# Altium PCB Pukk-Display-Module-v1.0.PcbDoc (part 4 of 5)
Units mil, origin at the board's own origin, x right, y up, seen from the top; angles counter-clockwise.
Board outline 3740.16 x 1574.8 mil, 4 copper layers (Top Layer, GND, POWER, Bottom Layer), stack 61.653 mil thick; 157 components, 115 nets, 640 pads, 314 vias.
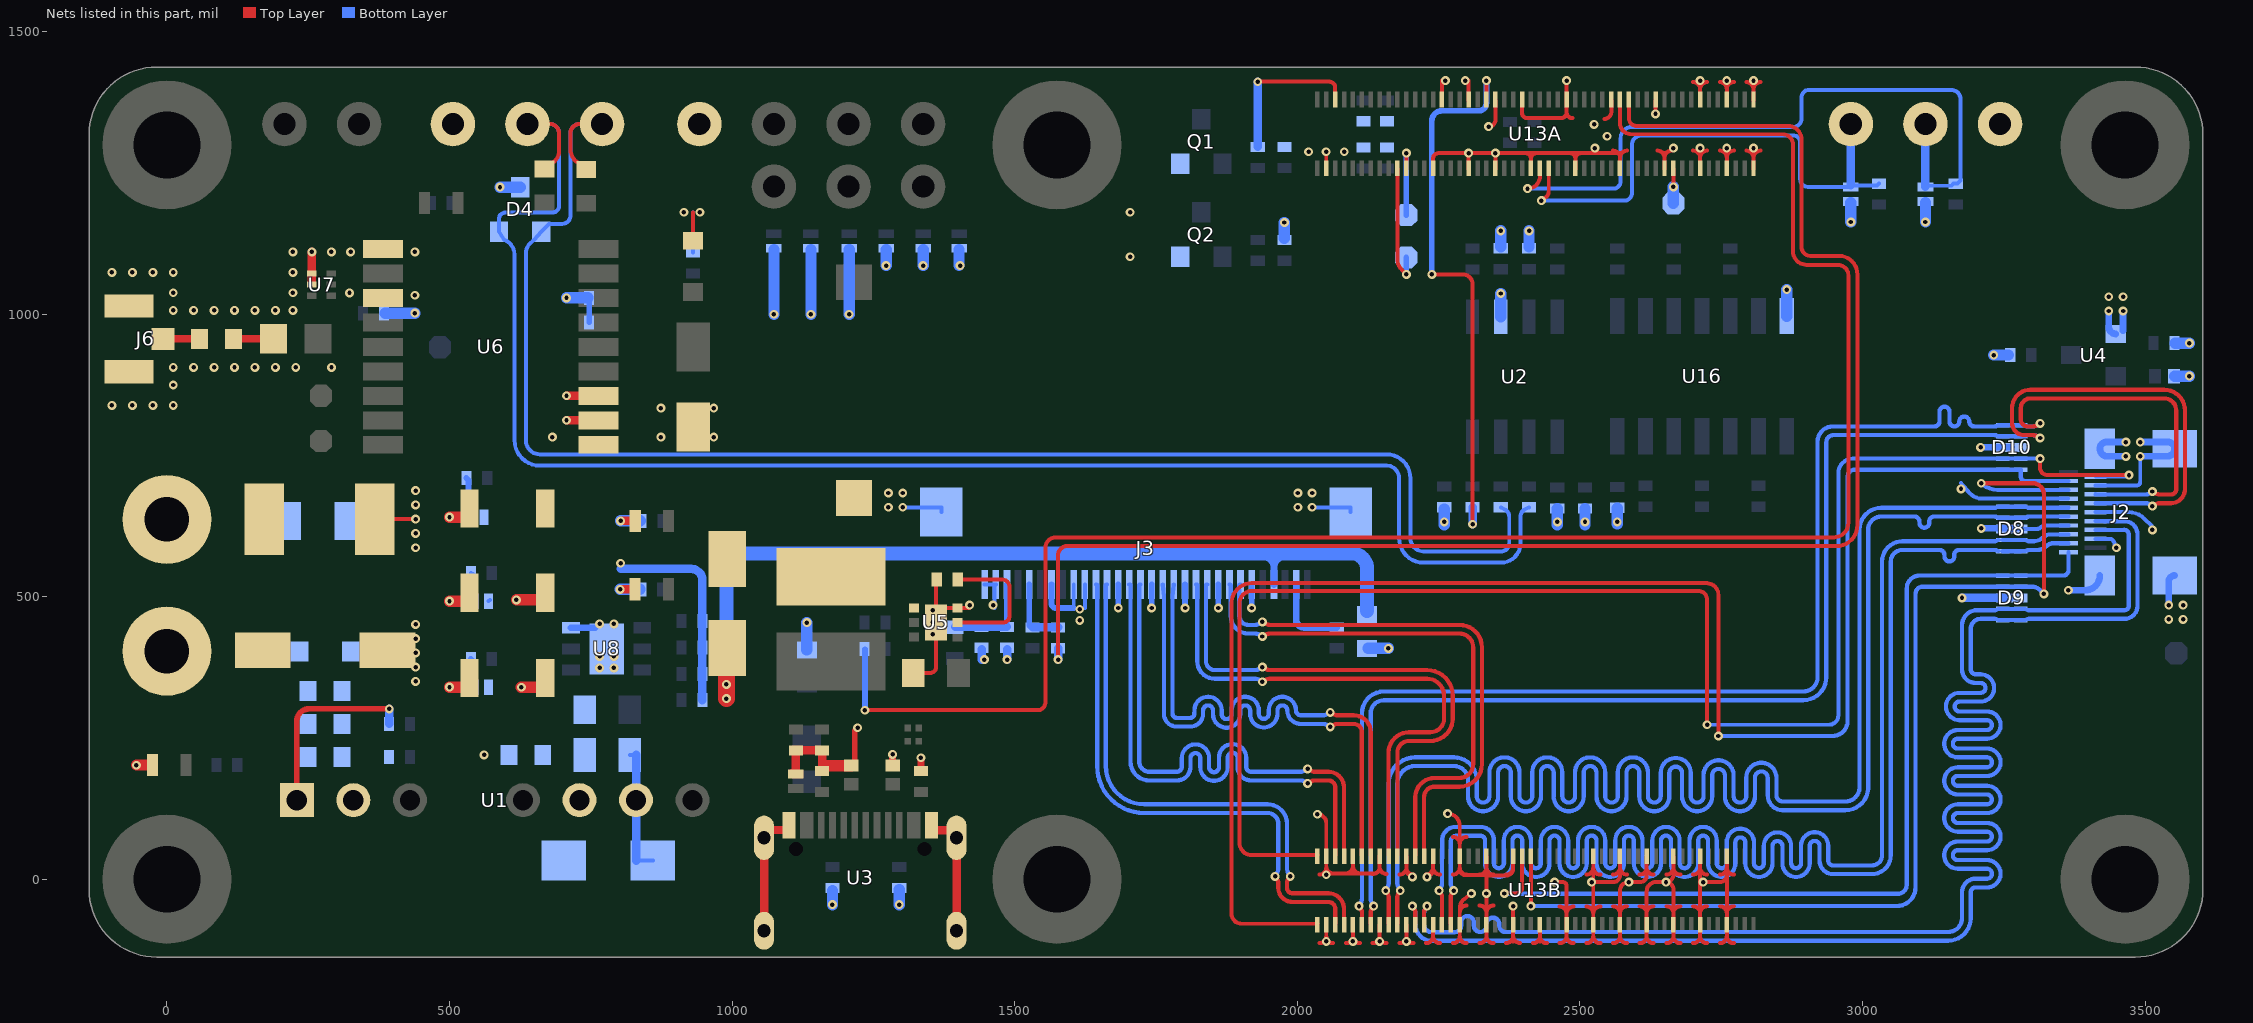
[diagram p4: the nets of this part, all layers, seen from the top]

## Via types
v1: diameter 15.75, hole 7.87, Top Layer to Bottom Layer, tented both sides, 314 vias

## Nets (pads, with @x,y where several pads share a name; then routed paths per layer and width w, separated by ;. In a path a pad name is that pad's centre, name@x,y a point inside that pad or via, vN(x,y) a via of type N, cw(c..) or ccw(c..) an arc to the next point about the centre after c; other vN are vias at no path point) (continued)
CAN1_N: D4.2 P4.1 R9.2 SB1.1 | length 2894.5
  Top Layer w7: P4.1@638,1336 678,1336 cw(c678,1320) 694,1320 694,1289.46 cw(c668,1289.46) 682,1267.55 SB1.1@668,1256.51
  Bottom Layer w7: P4.1@638,1336 678,1336 cw(c678,1320) 694,1320 694,1191.85 cw(c681.68,1191.85) 681.68,1179.54 598.81,1179.54 ccw(c598.81,1168.32) 587.6,1168.32 D4.2@587.6,1145.63 597.15,1131.02 cw(c587.6,1105.34) 615,1105.34 615,776.6 ccw(c659.81,776.6) 659.81,731.79 2157.86,731.79 cw(c2157.86,709.57) 2180.08,709.57 2180.08,603.43 ccw(c2223.51,603.43) 2223.51,560 2360,560 ccw(c2360,595) 2395,595 2395,641.53 cw(c2410,641.53) 2401,653.53 R9.2@2410,658
CAN1_P: D4.1 P3.1 R7.2 R11.2 | length 2773.2
  Top Layer w7: R11.2@742,1256 728,1267.4 cw(c742,1291.65) 714,1291.65 714,1320 cw(c730,1320) 730,1336 P3.1@770,1336
  Bottom Layer w7: P3.1@770,1336 730,1336 ccw(c730,1320) 714,1320 714,1174.37 cw(c699.14,1174.37) 699.14,1159.51 676.29,1159.51 D4.1@662.4,1145.63 649.76,1131.02 646.39,1128.59 ccw(c662.4,1106.36) 635,1106.36 635,776.6 ccw(c659.81,776.6) 659.81,751.79 2157.86,751.79 cw(c2157.86,709.57) 2200.08,709.57 2200.08,603.43 ccw(c2223.51,603.43) 2223.51,580 2360,580 ccw(c2360,595) 2375,595 2375,641.01 ccw(c2360,641.01) 2369,653.01 R7.2@2360,658
CAN_STB: R6.1 U13A.61 | length 997.8
  Top Layer w7: v1(2238,1070) 2293,1070 cw(c2293,1053) 2310,1053 v1(2310,628) ; U13A.61@2334.64,1377.95 v1(2334.64,1413.09)
  Bottom Layer w10: v1(2238,1070) 2238,1341.6 cw(c2255.9,1341.6) 2255.9,1359.5 2320.43,1359.5 ccw(c2320.43,1373.71) 2334.64,1373.71 v1(2334.64,1413.09)
  Bottom Layer w15: v1(2310,628) R6.1@2310,658
DIY_LED: R33.1 U13A.95 | length 281.2
  Top Layer w7: v1(1930,1411) 2056.98,1411 cw(c2056.98,1401.05) 2066.93,1401.05 2066.93,1388.23 U13A.95@2066.93,1377.95
  Bottom Layer w15: R33.1@1930,1295.52 v1(1930,1411)
EEPROM_nWP: P15.1 U13A.20 | length 60.7
  Top Layer w7: v1(2665.35,1225) U13A.20@2665.35,1256.69
  Bottom Layer w20: P15.1@2665.35,1196 v1(2665.35,1225)
ENC_CHA: D16.2 P22.1 R38.1 U13A.48 | length 953.2
  Top Layer w7: v1(2431.74,1200.48) 2439.74,1206.61 ccw(c2431.74,1217.04) 2444.88,1217.04 U13A.48@2444.88,1258.26
  Bottom Layer w7: v1(2431.74,1200.48) 2578.48,1200.48 ccw(c2578.48,1214) 2592,1214 2592,1299 cw(c2609,1299) 2609,1316 2877.02,1316 cw(c2877.02,1303.31) 2889.71,1303.31 2889.71,1238.42 ccw(c2903.13,1238.42) 2903.13,1225 2976.85,1225 ccw(c2976.85,1227.52) D16.2@2979.37,1227.52 ; D16.2@2980.63,1226.26 2981.89,1227.52 3025.99,1227.52 R38.1@3029,1230.53
  Bottom Layer w15: D16.2@2979.37,1227.52 P22.1@2979.37,1336
ENC_CHB: D24.2 P23.1 R39.1 U13A.50 | length 1294.6
  Top Layer w7: v1(2407.27,1221.72) ccw(c2407.27,1243.58) 2409.78,1221.86 ccw(c2407.27,1243.58) 2427.7,1235.8 ccw(c2407.27,1243.58) 2429.13,1243.58 U13A.50@2429.13,1258.26
  Bottom Layer w7: v1(2407.27,1221.72) 2558.72,1221.72 ccw(c2558.72,1235) 2572,1235 2572,1311 cw(c2592,1311) 2592,1331 2877.45,1331 ccw(c2877.45,1345.55) 2892,1345.55 2892,1382.96 cw(c2905.58,1382.96) 2905.58,1396.54 3156.87,1396.54 cw(c3156.87,1379.98) 3173.43,1379.98 3173.43,1236.03 3168.13,1230.73 R39.1@3161,1230.73 ; D24.2@3111.37,1225 3113.27,1226.9 3157.37,1226.9 R39.1@3161,1230.53
  Bottom Layer w15: D24.2@3111.37,1225 P23.1@3111.37,1336
GND: C5.1 C6.1 C7.1 C8.1 C9.1 C10.1 C11.1 C12.1 C13.1 C14.1 C15.1 C16.1 C17.1 C18.1 C19.1 C20.1 C21.1 C22.1 C23.1 C24.1 C25.2 C27.1 C28.2 C29.1 C30.1 C32.1 C33.1 C34.1 C35.1 C80.2 D3.1 D4.3 D5.2 D6.2 D7.2 D8.3_8 D9.3_8 D10.3_8 D11.2 D14.1 D15.2 D16.1 D17.2 D18.2 D19.1 D20.1 D21.1 D22.1 D23.1 D24.1 J2.4 J2.7 J2.10 J2.13 J2.16 J2.20 J3.1 J3.2 J3.7 J3.9 J3.10 J3.13 J3.16 J3.19 J3.22 J3.25 J3.S1 J3.S2 J4.2 J6.2 J6.3 LED1.2 P5.1 P14.1 P24.1 Q1.2 Q2.2 R5.1 R13.1 R14.1 R18.1 R35.1 R36.1 SW1.2 SW2.2 SW3.2 U1.7 U2.2 U3.A1/B12 U3.B1/A12 U3.S1 U3.S2 U3.S3 U3.S4 U4.1 U5.3 U5.7 U6.1 U6.10 U6.12 U7.1 U7.2 U8.6 U8.7 U13A.1 U13A.2 U13A.7 U13A.8 U13A.13 U13A.14 U13A.22 U13A.23 U13A.32 U13A.33 U13A.42 U13A.43 U13A.52 U13A.53 U13A.59 U13A.60 U13A.65 U13A.66 U13A.71 U13A.74 U13A.98 U13B.7 U13B.8 U13B.13 U13B.14 U13B.19 U13B.20 U13B.25 U13B.26 U13B.31 U13B.32 U13B.37 U13B.38 U13B.44 U13B.50 U13B.55 U13B.56 U13B.61 U13B.62 U13B.67 U13B.68 U13B.73 U13B.74 U13B.79 U13B.80 U13B.85 U13B.86 U13B.91 U13B.92 U13B.97 U13B.98 U16.7 | length 10085.1
  Top Layer w7: J6.2@-67.02,897.93 J6.2@-61.05,897.93 ; J6.3@-67.02,1014.07 J6.3@-61.05,1014.07 ; SW2.2@656.8,494.32 SW2.2@669.44,507 ; SW1.2@656.8,640.09 669.44,652.73 SW1.2@669.44,656 ; SW3.2@669.44,339.6 SW3.2@669.44,356 ; C17.1@1159.22,191.61 1159.57,197.11 1163.43,200.96 ; D7.2@1211.02,201.4 D7.2@1217,207.38 ; J4.2@1215.72,674.41 J4.2@1215.72,683.31 ; R18.1@1320.58,365 1350.43,365 ccw(c1350.43,375.65) 1361.08,375.65 U5.7@1361.08,433.51 ; U5.7@1360.58,454.23 1360.58,479.82 U5.7@1361.08,479.82 ; C23.1@1362.08,530 1361.08,530 U5.7@1361.08,479.82 ; v1@1420.18,479.82 U5.3@1398.97,479.82 U5.7@1361.08,479.82 ; v1(2035.43,115) cw(c2035.43,99.25) 2051.18,99.25 2051.18,42.51 2051.18,22.58 ; 2038.78,-113.07 ccw(c2038.78,-100.68) 2051.18,-100.68 ; 2038.78,8.19 ccw(c2038.78,20.58) 2051.18,20.58 ; v1(2051.18,-110) 2051.18,-98.68 ; U13B.98@2051.18,-80.75 2051.18,-100.68 ; U13A.98@2051.18,1258.26 v1@2051.18,1286.68 ; 2063.57,-113.07 cw(c2063.57,-100.68) 2051.18,-100.68 ; 2063.57,10.19 cw(c2063.57,22.58) 2051.18,22.58 ; 2086.03,-113.07 ccw(c2086.03,-100.68) 2098.42,-100.68 ; 2086.03,10.19 ccw(c2086.03,22.58) 2098.42,22.58 ; v1(2098.42,-110) 2098.42,-98.68 ; U13B.92@2098.42,-80.75 2098.42,-100.68 ; U13B.91@2098.42,42.51 2098.42,22.58 ; 2110.82,-113.07 cw(c2110.82,-100.68) 2098.42,-100.68 ; 2110.82,10.19 cw(c2110.82,22.58) 2098.42,22.58 ; 2133.27,-113.07 ccw(c2133.27,-100.68) 2145.67,-100.68 ; 2133.27,9.19 ccw(c2133.27,21.58) 2145.67,21.58 ; v1@2145.67,-112 2145.67,-100.68 ; U13B.86@2145.67,-80.75 2145.67,-100.68 ; 2145.67,22.58 2145.67,20.75 cw(c2134.92,20.75) 2134.92,10 2091.41,10 ; U13B.85@2145.67,41.51 2145.67,21.58 ; 2158.06,-113.07 cw(c2158.06,-100.68) 2145.67,-100.68 ; 2158.06,9.19 cw(c2158.06,21.58) 2145.67,21.58 ; 2180.51,-113.07 ccw(c2180.51,-100.68) 2192.91,-100.68 ; 2180.51,8.19 ccw(c2180.51,20.58) 2192.91,20.58 ; v1(2192.91,-110) 2192.91,-98.68 ; U13B.80@2192.91,-80.75 2192.91,-100.68 ; 2192.91,16.01 2192.91,21.58 ; 2192.91,17.01 ccw(c2203.66,17.01) v1@2203.66,6.26 ; U13B.79@2192.91,40.51 2192.91,20.58 ; 2205.31,-113.07 cw(c2205.31,-100.68) 2192.91,-100.68 ; v1@2205.31,8.19 cw(c2205.31,20.58) 2192.91,20.58 ; 2227.76,-113.07 ccw(c2227.76,-100.68) 2240.15,-100.68 ; v1@2227.76,8.19 ccw(c2227.76,20.58) 2240.15,20.58 ; v1@2229.41,6.26 ccw(c2229.41,17.01) 2240.15,17.01 ; U13B.74@2240.15,-80.75 2240.15,-100.68 ; 2240.15,16.01 2240.15,21.58 ; U13B.73@2240.15,40.51 2240.15,20.58 ; U13A.74@2240.15,1256.69 2240.15,1274.76 cw(c2249.98,1274.76) 2249.98,1284.59 v1(2350.39,1284.59) ; 2252.55,-113.07 cw(c2252.55,-100.68) 2240.15,-100.68 ; 2252.55,8.19 cw(c2252.55,20.58) 2240.15,20.58 ; U13A.71@2255.9,1377.95 v1@2255.9,1413.09 ; v1(2266,116) cw(c2266,94.6) 2287.4,94.6 2287.4,62.44 ; 2275,-113.07 ccw(c2275,-100.68) 2287.4,-100.68 ; 2275,8.19 ccw(c2275,20.58) 2287.4,20.58 ; 2275,74.84 cw(c2275,62.44) 2287.4,62.44 ; U13B.68@2287.4,-80.75 2287.4,-100.68 ; U13B.68@2287.4,-78.75 2287.4,-58.82 ; 2287.4,17.07 2287.4,21.58 ; 2287.4,18.07 ccw(c2298.35,18.07) 2298.35,7.12 2333.15,7.12 2334.64,8.61 ; U13B.67@2287.4,40.51 2287.4,20.58 ; U13B.67@2287.4,42.51 2287.4,62.44 ; 2299.79,-113.07 cw(c2299.79,-100.68) 2287.4,-100.68 ; 2299.79,-46.42 ccw(c2299.79,-58.82) 2287.4,-58.82 ; 2299.79,8.19 cw(c2299.79,20.58) 2287.4,20.58 ; 2299.79,74.84 ccw(c2299.79,62.44) 2287.4,62.44 ; U13A.66@2303.15,1256.69 v1(2303.15,1284.59) ; U13A.65@2303.15,1377.95 v1@2303.15,1413.09 ; v1(2307.83,-25.3) 2295.39,-34.84 ccw(c2307.83,-51.05) 2287.4,-51.05 2287.4,-58.82 ; 2322.25,-113.07 ccw(c2322.25,-100.68) 2334.64,-100.68 ; 2322.25,-46.42 cw(c2322.25,-58.81) 2334.64,-58.81 ; 2322.25,8.19 ccw(c2322.25,20.58) 2334.64,20.58 ; U13B.62@2334.64,-80.75 2334.64,-100.68 ; U13B.62@2334.64,-78.75 2334.64,-58.81 ; 2334.64,7.61 2334.64,21.58 ; U13B.61@2334.64,40.51 2334.64,20.58 ; v1(2338.58,1331.51) ccw(c2338.58,1343.32) 2350.39,1343.32 U13A.59@2350.39,1377.95 ; 2347.04,-113.07 cw(c2347.04,-100.68) 2334.64,-100.68 ; 2347.04,-46.42 ccw(c2347.04,-58.81) 2334.64,-58.81 ; 2347.04,8.19 cw(c2347.04,20.58) 2334.64,20.58 ; U13A.60@2350.39,1256.69 v1(2350.39,1284.59) ; 2369.49,-113.07 ccw(c2369.49,-100.68) 2381.89,-100.75 ; 2369.49,8.19 ccw(c2369.49,20.58) 2381.89,20.58 U13B.55@2381.89,40.51 ; 2381.89,-110 2381.89,-98.75 ccw(c2369.49,-98.68) 2381.89,-98.68 2381.89,-78.75 v1(2381.89,-47.49) ; 2381.89,-100.68 ccw(c2394.28,-100.68) 2381.89,-100.75 ; U13B.56@2381.89,-80.75 2381.89,-100.75 ; 2381.89,17.62 2381.89,21.58 ; 2381.89,18.62 cw(c2370.08,18.62) 2370.08,6.81 2336.44,6.81 cw(c2336.44,8.61) 2334.64,8.61 ; 2394.28,-113.07 cw(c2394.28,-100.68) 2381.89,-100.75 ; U13A.53@2397.63,1377.95 2397.63,1355.71 ccw(c2406.92,1355.71) 2406.92,1346.42 2465.95,1346.42 ccw(c2465.95,1356.85) 2476.37,1356.85 ; U13A.52@2413.38,1256.69 2413.38,1274.76 ; 2416.74,-113.07 ccw(c2416.74,-100.68) 2429.13,-100.68 ; 2429.13,-110 2429.13,-98.68 ; U13B.50@2429.13,-80.75 2429.13,-100.68 ; 2441.53,-113.07 cw(c2441.53,-100.68) 2429.13,-100.68 ; v1(2455.2,-5) 2469.23,-5 cw(c2469.23,-12.14) 2476.37,-12.14 U13B.44@2476.37,-78.75 ; 2463.98,-113.07 ccw(c2463.98,-100.68) 2476.37,-100.68 ; 2463.98,-48.42 cw(c2463.98,-60.81) 2476.37,-60.81 cw(c2488.77,-60.81) 2488.77,-48.42 ; U13B.44@2476.37,-80.75 2476.37,-100.68 ; v1(2476.37,1413.09) 2476.37,1377.95 2476.37,1356.85 ; 2486.8,1346.42 cw(c2486.8,1356.85) 2476.37,1356.85 ; 2488.77,-113.07 cw(c2488.77,-100.68) 2476.37,-100.68 ; U13A.42@2492.12,1256.69 2492.12,1274.76 ; 2492.12,1277.09 2492.12,1274.76 ; 2511.22,-113.07 ccw(c2511.22,-100.68) 2523.62,-100.68 ; 2511.22,-48.42 cw(c2511.22,-60.81) 2523.62,-60.81 cw(c2536.01,-60.81) 2536.01,-48.42 ; 2511.22,8.19 ccw(c2511.22,20.58) 2523.62,20.58 ; U13B.38@2523.62,-80.75 2523.62,-100.68 ; U13B.38@2523.62,-78.75 2523.62,-7.85 ccw(c2520.77,-7.85) v1(2520.77,-5) ; v1@2523.62,-0.12 2523.62,20.58 ; v1@2523.62,1.88 cw(c2513.9,1.88) v1(2520.77,-5) ; U13B.37@2523.62,40.51 2523.62,20.58 ; 2536.01,-113.07 cw(c2536.01,-100.68) 2523.62,-100.68 ; 2536.01,8.19 cw(c2536.01,20.58) 2523.62,20.58 ; 2543.16,1345.18 ccw(c2543.16,1357.58) 2555.55,1357.58 2555.55,1377.51 U13A.33@2555.11,1377.95 ; 2558.47,-113.07 ccw(c2558.47,-100.68) 2570.86,-100.68 ; 2558.47,-47.85 cw(c2558.47,-60.24) 2570.86,-60.24 cw(c2583.26,-60.24) 2583.26,-47.85 ; 2558.47,8.19 ccw(c2558.47,20.58) 2570.86,20.58 ; 2558.47,1289.02 cw(c2558.47,1276.62) 2567.96,1284.59 ; U13B.32@2570.86,-80.75 2570.86,-100.68 ; U13B.32@2570.86,-78.75 2570.86,-20.66 cw(c2586.52,-20.66) v1(2586.52,-5) 2606.3,-5.02 ccw(c2606.3,6.79) 2618.11,6.79 ; 2570.86,4.81 2570.86,20.58 ; 2570.86,6.81 cw(c2559.05,6.81) 2559.05,-5 v1(2520.77,-5) ; U13B.31@2570.86,40.51 2570.86,20.58 ; U13A.32@2570.86,1256.69 2570.86,1276.62 ; 2583.26,-113.07 cw(c2583.26,-100.68) 2570.86,-100.68 ; 2583.26,8.19 cw(c2583.26,20.58) 2570.86,20.58 ; 2583.26,1289.02 ccw(c2583.26,1276.62) 2570.86,1276.62 ; 2605.71,-113.07 ccw(c2605.71,-100.68) 2618.11,-100.68 ; 2605.71,-47.85 cw(c2605.71,-60.24) 2618.1,-60.24 cw(c2630.5,-60.24) 2630.5,-47.85 ; 2605.71,8.19 ccw(c2605.71,20.58) 2618.11,20.58 ; U13B.26@2618.11,-80.75 2618.11,-100.68 ; U13B.26@2618.11,-78.75 2618.11,-21.44 cw(c2634.55,-21.44) 2634.55,-5 v1(2652.27,-5) ; 2618.11,4.79 2618.11,20.58 ; U13B.25@2618.11,40.51 2618.11,20.58 ; 2630.5,-113.07 cw(c2630.5,-100.68) 2618.11,-100.68 ; 2630.5,8.19 cw(c2630.5,20.58) 2618.11,20.58 ; v1@2633.85,1354.11 U13A.23@2633.85,1377.95 ; 2637.21,1289.02 cw(c2637.21,1276.62) 2649.6,1276.62 ; U13A.22@2649.6,1256.69 2649.6,1276.62 ; 2649.6,1285 2649.6,1276.62 ; 2652.96,-113.07 ccw(c2652.96,-100.68) 2665.35,-100.68 ; 2652.95,-47.85 cw(c2652.95,-60.24) 2665.35,-60.24 cw(c2677.74,-60.24) 2677.74,-47.85 ; 2652.96,8.19 ccw(c2652.96,20.58) 2665.35,20.58 ; v1@2662,1289.02 ccw(c2662,1276.62) 2649.6,1276.62 ; U13B.20@2665.35,-80.75 2665.35,-100.68 ; U13B.20@2665.35,-78.75 2665.35,-18.08 ccw(c2652.27,-18.08) v1(2652.27,-5) ; 2665.35,6.08 2665.35,20.58 ; 2665.35,8.08 cw(c2652.27,8.08) v1(2652.27,-5) ; U13B.19@2665.35,40.51 2665.35,20.58 ; 2677.75,-113.07 cw(c2677.75,-100.68) 2665.35,-100.68 ; 2677.75,8.19 cw(c2677.75,20.58) 2665.35,20.58 ; 2700.2,-113.07 ccw(c2700.2,-100.68) 2712.6,-100.68 ; 2700.2,-47.85 cw(c2700.2,-60.24) 2712.59,-60.24 cw(c2724.99,-60.24) 2724.99,-47.85 ; 2700.2,8.19 ccw(c2700.2,20.58) 2712.6,20.58 ; 2700.2,1289.02 cw(c2700.2,1276.62) 2712.6,1276.62 ; 2700.2,1410.28 cw(c2700.2,1397.88) 2712.6,1397.88 ; U13B.14@2712.6,-80.75 2712.6,-100.68 ; U13B.14@2712.6,-78.75 2712.6,0.99 ccw(c2718.61,0.99) 2718.61,-5.02 2748.03,-5.02 ccw(c2748.03,6.79) 2759.84,6.74 U13B.8@2759.84,-78.75 ; v1@2712.6,-1.01 2712.6,20.58 ; U13B.13@2712.6,40.51 2712.6,20.58 ; U13A.14@2712.6,1256.69 2712.6,1276.62 ; 2712.6,1285 2712.6,1276.62 ; U13A.13@2712.6,1377.95 2712.6,1397.88 ; v1(2712.6,1413.09) 2712.6,1397.88 ; 2724.99,-113.07 cw(c2724.99,-100.68) 2712.6,-100.68 ; 2724.99,8.19 cw(c2724.99,20.58) 2712.6,20.58 ; 2724.99,1289.02 ccw(c2724.99,1276.62) 2712.6,1276.62 ; 2724.99,1410.28 ccw(c2724.99,1397.88) 2712.6,1397.88 ; 2747.44,-113.07 ccw(c2747.44,-100.68) 2759.84,-100.68 ; 2747.44,-47.85 cw(c2747.44,-60.24) 2759.84,-60.24 cw(c2772.23,-60.24) 2772.23,-47.85 ; 2747.44,8.19 ccw(c2747.44,20.58) 2759.84,20.58 ; 2747.44,1289.02 cw(c2747.44,1276.62) 2759.84,1276.62 ; 2747.44,1410.28 cw(c2747.44,1397.88) 2759.84,1397.88 ; U13B.8@2759.84,-80.75 2759.84,-100.68 ; 2759.84,4.79 2759.84,20.58 ; U13B.7@2759.84,40.51 2759.84,20.58 ; U13A.8@2759.84,1256.69 2759.84,1276.62 ; 2759.84,1285 2759.84,1276.62 ; U13A.7@2759.84,1377.95 2759.84,1397.88 ; v1(2759.84,1413.09) 2759.84,1397.88 ; 2772.23,-113.07 cw(c2772.23,-100.68) 2759.84,-100.68 ; 2772.23,8.19 cw(c2772.23,20.58) 2759.84,20.58 ; 2772.23,1289.02 ccw(c2772.23,1276.62) 2759.84,1276.62 ; 2772.23,1410.28 ccw(c2772.23,1397.88) 2759.84,1397.88 ; 2794.69,1289.02 cw(c2794.69,1276.62) 2807.08,1276.62 ; 2794.69,1410.28 cw(c2794.69,1397.88) 2807.08,1397.88 ; U13A.2@2807.08,1256.69 2807.08,1276.62 ; 2807.08,1285 2807.08,1276.62 ; U13A.1@2807.08,1377.95 2807.08,1397.88 ; v1(2807.08,1413.09) 2807.08,1397.88 ; 2819.48,1289.02 ccw(c2819.48,1276.62) 2807.08,1276.62 ; 2819.48,1410.28 ccw(c2819.48,1397.88) 2807.08,1397.88 ; 2051.18,22.58 2051.18,10 2091.41,10 ; 2091.41,10 ccw(c2091.41,17.01) 2098.42,17.01 2098.42,22.58 ; 2334.64,-58.81 v1(2334.64,-25.3) 2334.64,8.61 ; v1(2350.39,1284.59) 2403.56,1284.59 ; 2403.56,1284.59 cw(c2403.56,1274.76) 2413.38,1274.76 ; 2403.56,1284.59 2423.21,1284.59 ; 2413.38,1274.76 cw(c2423.21,1274.76) 2423.21,1284.59 ; 2423.21,1284.59 2482.3,1284.59 ; 2482.3,1284.59 cw(c2482.3,1274.76) 2492.12,1274.76 ; 2482.3,1284.59 2501.95,1284.59 ; 2492.12,1274.76 cw(c2501.95,1274.76) 2501.95,1284.59 ; 2501.95,1284.59 2567.96,1284.59 ; 2567.96,1284.59 cw(c2558.47,1276.62) 2570.86,1276.62 ; 2567.96,1284.59 2570.86,1284.59 2570.86,1276.62
  Top Layer w10: D7.2@1217,207.38 v1@1217,263
  Top Layer w12: D5.2@1105.18,188.59 1105.18,187.78 1107.05,185.9 D5.2@1112.96,185.9 ; D6.2@1283.96,201.4 v1(1283.96,220.88) ; v1@1334,210 1334.13,209.87 1334.13,191.74 C18.1@1334.26,191.61
  Top Layer w15: U7.2@256.54,1055.11 U7.1@256.54,1071.69 v1(256.54,1109.85) ; U3.S3@1056.5,-91.28 U3.S4@1056.5,73.29 ; U3.S4@1056.5,73.97 1069.63,87.1 1092.48,87.1 1100.79,95.41 U3.A1/B12@1100.79,95.73 U3.A1/B12@1100.79,96.05 ; D5.2@1112.96,185.9 C15.1@1112.96,227.83 C16.1@1159.22,227.83 C17.1@1159.22,191.61 ; U3.B1/A12@1352.76,95.73 1352.76,95.09 1361.07,86.78 1383.91,86.78 1397.05,73.65 U3.S1@1397.05,73.29 U3.S2@1397.05,-91.28
  Top Layer w20: v1@-53.71,202 LED1.2@-27.76,202 ; v1(618.4,494.32) SW2.2@656.8,494.32 ; v1(627.05,339.6) SW3.2@669.44,339.6 ; 1163.43,200.96 D7.2@1210.58,200.96
  Bottom Layer w7: D17.2@569.17,492 D17.2@571.49,494.32 ; C5.1@819,220 C5.1@830,220 ; D3.1@830,33 D3.1@859.74,33 ; v1(1301.9,658.06) 1370.08,658.06 J3.S2@1370.08,649.6 ; J3.1@1446.85,521.65 J3.2@1463.84,521.65 ; v1@1463.84,479.82 J3.2@1463.84,521.65 ; J3.2@1466.84,521.65 J3.2@1466.53,521.65 J3.2@1463.84,521.65 ; 1604.48,479.82 J3.9@1604.48,521.65 ; 1624.17,479.82 J3.10@1624.17,521.65 ; v1(2026.31,658.06) 2094.49,658.06 J3.S1@2094.49,649.6 ; 3174.2,700.64 3179.17,695.04 3190.16,682.65 ccw(c3210.43,700.64) 3210.43,673.53 3232.4,673.53 3232.51,673.64 3348.28,673.64 3348.4,673.52 J2.13@3363.91,673.52 ; D8.3_8@3264,619.83 3309.56,619.83 ccw(c3309.56,626.89) 3314.56,621.9 cw(c3324.05,612.4) 3324.05,625.83 J2.7@3364.36,625.83 ; J2.4@3412.39,602.21 3436.54,602.21 cw(c3436.54,593.14) 3445.47,594.76 v1@3447.03,586.49 ; J2.10@3412.39,649.46 3470.37,649.46 cw(c3470.45,609.05) 3499.02,637.62 3511.11,625.54 3511.11,619.63 v1(3512.78,617.96) ; J2.16@3412.39,696.7 3485.01,696.7 ccw(c3485.01,703.05) 3491.35,703.05 v1(3491.35,748.21)
  Bottom Layer w10: C29.1@747,985.14 C30.1@747,1028.54 ; J3.7@1564.96,521.65 1564.96,487.53 ccw(c1572.67,487.53) 1572.67,479.82 1604.48,479.82 ; v1(1683.22,479.82) J3.13@1683.22,521.65 ; v1(1742.28,479.82) J3.16@1742.28,521.65 ; v1(1801.33,479.82) J3.19@1801.33,521.65 ; v1(1860.39,479.82) J3.22@1860.39,521.65 ; v1(1919.29,479.82) J3.25@1919.29,521.65
  Bottom Layer w12: U8.6@715.19,444.89 U8.7@757.21,444.89 ; v1(3208.83,764.16) D10.3_8@3263.78,764.16 ; v1(3210.04,620.83) 3263,620.83 D8.3_8@3264,619.83 ; v1(3364.36,511.22) 3393.84,511.22 ccw(c3393.84,537.25) J2.20@3419.87,537.25 ; v1(3435.66,1005.34) 3435.66,977.34 ccw(c3448.2,977.34) U4.1@3448.2,964.8 ; U4.1@3460.91,970.2 v1(3460.91,1005.34) ; v1(3466.1,748.21) 3433.32,748.21 cw(c3433.32,761.66) J2.20@3419.87,761.66 cw(c3431.67,761.66) 3431.67,773.46 v1(3466.1,773.46) ; v1(3491.35,748.21) 3538.7,748.21 ccw(c3538.7,761.66) J2.20@3552.15,761.66 ccw(c3540.35,761.66) 3540.35,773.46 v1(3491.35,773.46) ; v1(3541.81,484.93) 3541.81,526.91 cw(c3552.15,526.91) J2.20@3552.15,537.25
  Bottom Layer w15: 802.68,549 927.8,549 cw(c927.8,529.3) 947.5,529.3 C34.1@947.5,456.59 C33.1@947.5,363.05 C32.1@947.5,317 ; D3.1@830,33 U1.7@830,140 C5.1@830,220 ; v1@1441.32,388.66 C24.1@1441.32,406.8 ; v1(1486.59,388.66) C25.2@1486.59,406.8 ; v1(3176.01,497.88) D9.3_8@3260.06,497.88
  Bottom Layer w20: C27.1@386.12,1001.46 v1(438.89,1001.46) ; v1(589.37,1224.37) D4.3@625,1224.37 ; v1(707,1028.54) C30.1@745,1028.54 ; v1(1074,999.5) D23.1@1074,1114.28 ; C21.1@1132.28,405.55 v1(1132.28,453.86) ; v1(1139.5,999.5) D14.1@1139.5,1114.28 ; v1(1177.56,-45) R13.1@1177.56,-20.28 ; v1(1207,999.5) D21.1@1207,1114.28 ; v1(1272.5,1085.67) D20.1@1272.5,1113.6 ; v1(1295.65,-45) R14.1@1295.65,-18.31 ; v1(1338,1085.67) D22.1@1338,1113.6 ; v1@1401.5,1085.67 D19.1@1401.5,1113.6 ; R36.1@1977,1133.96 v1(1977,1161.89) ; C22.1@2125.17,408.59 2161.15,408.59 v1(2161.22,408.52) ; v1@2260,627.26 v1(2260,632.27) R5.1@2260,655.19 ; U2.2@2360,995.3 v1(2360,1036.33) ; C11.1@2360,1119.16 v1(2360,1147.09) ; C12.1@2410,1119.16 v1(2410,1147.09) ; v1@2460,627.27 v1(2460,632.27) C14.1@2460,655.19 ; v1@2509,627.27 v1(2509,632.27) C13.1@2509,655.2 ; v1@2566,628.39 v1(2566,632.27) C80.2@2566,656.32 ; U16.7@2866,996.3 v1(2866,1043.19) ; v1(2979.37,1162.79) D16.1@2979.37,1196.6 ; v1(3111.37,1162.79) D24.1@3111.37,1196.6 ; v1(3232.11,927.4) C19.1@3258.22,927.4 ; D11.2@3552.24,890 v1(3578.35,890) ; C20.1@3553.45,948.54 v1(3578.35,948.54)
  other v1: 2145.67,-110 2718.02,-5 2203.66,4.26 2229.41,4.26 2051.18,8 -54.09,201.62 1334,215 561.3,220 1222,268 765.44,373.88 790.69,373.88 1446.32,388.66 765.44,394.13 790.69,394.13 1355.08,433.51 765.44,451.63 790.69,451.63 1355.08,454.71 1615.04,458.05 3541.81,459.67 3567.07,459.67 1355.08,475.92 1615.04,477.73 1420.18,484.82 1461.84,484.82 3567.07,484.93 802.68,559 3449.04,586.46 1276.65,658.06 2001.05,658.06 1276.65,683.31 1301.9,683.31 2001.05,683.31 2026.31,683.31 3174.2,690.64 682,782.19 874.11,782.19 967.53,782.19 874.11,833.42 967.53,833.42 -97.18,838.28 -61.05,838.28 -24.92,838.28 11.21,838.28 11.21,874.41 11.21,905.54 47.34,905.54 83.47,905.54 119.61,905.54 155.74,905.54 191.87,905.54 228,905.54 291.18,905.54 11.21,1006.46 47.34,1006.46 83.47,1006.46 119.61,1006.46 155.74,1006.46 191.87,1006.46 223,1006.46 3435.66,1030.6 3460.91,1030.6 438.89,1033.24 11.21,1037.59 223,1037.59 323.11,1037.39 -97.18,1073.72 -61.05,1073.72 -24.92,1073.72 11.21,1073.72 223,1073.72 1403.5,1085.67 1704.12,1101.26 223,1109.85 290.99,1109.85 325.11,1110 438.89,1109.85 1704.12,1180 2020.09,1287.09 2051.09,1287.09 2083.09,1287.09 2526.5,1293.5 2665.35,1293.5 2712.59,1293.5 2759.84,1293.5 2807.08,1293.5 2548,1314.5 2525.14,1335.5 2633.74,1354.11 2261.9,1413.09 2297.15,1413.09
GPS_RX: R24.2 U6.3 | length 97
  Top Layer w10: U6.3@763.89,855.16 U6.3@763.89,855.31
  Top Layer w15: v1(707,855.31) U6.3@763.89,855.31
  Bottom Layer w10: v1(707,855.31) R24.2@747,855.31
GPS_TX: R25.2 U6.2 | length 97
  Top Layer w10: U6.2@763.89,811.85 U6.2@763.89,812
  Top Layer w15: v1(707,812) U6.2@763.89,812
  Bottom Layer w10: v1(707,812) R25.2@747,812
HDMI_TX0_N: D8.1 D8.10 J2.11 U13B.84 | length 2891.1
  Top Layer w7.5: v1(2156.41,-20) ccw(c2161.8,-20) 2157.99,-23.8 2159.01,-24.83 cw(c2152.75,-31.09) 2161.6,-31.09 U13B.84@2161.6,-78.56
  Bottom Layer w7.5: v1(2156.41,-20) cw(c2161.8,-20) 2157.99,-16.19 ccw(c2149.28,-7.48) 2161.6,-7.48 2161.6,168.61 cw(c2208.6,168.61) 2208.32,215.61 2208.5,215.61 2208.6,215.61 2276.87,215.61 2276.97,215.61 2277.29,215.61 cw(c2277.22,175.46) 2317.37,175.46 2317.37,146.8 ccw(c2328.62,146.8) 2339.87,146.8 2339.87,188.99 cw(c2366.49,188.99) 2393.12,188.99 2393.12,146.8 ccw(c2404.37,146.8) 2415.62,146.8 2415.62,188.99 cw(c2442.24,188.99) 2468.86,188.99 2468.86,146.8 ccw(c2480.11,146.8) 2491.36,146.8 2491.36,188.99 cw(c2517.99,188.99) 2544.61,188.99 2544.61,146.8 ccw(c2555.86,146.8) 2567.11,146.8 2567.11,188.99 cw(c2593.74,188.99) 2620.36,188.99 2620.36,146.8 ccw(c2631.61,146.8) 2642.86,146.8 2642.86,187.97 cw(c2669.48,187.97) 2696.11,187.97 2696.11,146.8 ccw(c2707.36,146.8) 2718.61,146.8 2718.61,183.92 cw(c2745.23,183.92) 2771.86,183.92 2771.86,146.8 ccw(c2783.11,146.8) 2794.36,146.8 2794.36,179.58 cw(c2820.98,179.58) 2847.6,179.58 2847.6,148.75 ccw(c2858.85,148.75) 2858.19,137.52 ccw(c2858.63,145.01) 2858.59,137.51 2969.52,137.51 ccw(c2969.52,162.76) 2994.72,160.95 ; 2994.72,161 ccw(c2987.23,161.44) 2994.68,162.36 2994.63,162.76 2994.63,618.71 cw(c3032.96,618.71) 3032.96,657.04 3233.51,657.04 ccw(c3233.51,664.54) 3236.1,657.51 3240.19,659.01 D8.10@3248.25,659.2 D8.1@3279.75,659.2 3287.81,659.01 3291.9,657.51 ccw(c3294.49,664.54) 3294.49,657.04 J2.11@3364.36,657.04
HDMI_TX0_P: D8.2 D8.9 J2.9 U13B.82 | length 2891.5
  Top Layer w7.5: U13B.82@2176.98,-78.56 2176.98,-31.09 cw(c2185.83,-31.09) 2179.57,-24.83 v1@2180.58,-23.81 ; v1@2180.59,-23.8 ccw(c2176.77,-20) v1(2182.16,-20)
  Bottom Layer w7.5: v1(2182.16,-20) ccw(c2176.77,-20) 2180.58,-16.19 cw(c2189.3,-7.48) 2176.98,-7.48 2176.98,168.61 cw(c2208.6,168.61) 2208.38,200.24 2208.51,200.24 2208.6,200.24 2276.87,200.24 2277,200.24 2277.29,200.24 cw(c2277.22,175.46) 2301.99,175.46 2301.99,146.8 ccw(c2328.62,146.8) 2355.24,146.8 2355.24,188.99 cw(c2366.49,188.99) 2377.74,188.99 2377.74,146.8 ccw(c2404.37,146.8) 2430.99,146.8 2430.99,188.99 cw(c2442.24,188.99) 2453.49,188.99 2453.49,146.8 ccw(c2480.11,146.8) 2506.74,146.8 2506.74,188.99 cw(c2517.99,188.99) 2529.24,188.99 2529.24,146.8 ccw(c2555.86,146.8) 2582.49,146.8 2582.49,188.99 cw(c2593.74,188.99) 2604.99,188.99 2604.99,146.8 ccw(c2631.61,146.8) 2658.23,146.8 2658.23,187.97 cw(c2669.48,187.97) 2680.73,187.97 2680.73,146.8 ccw(c2707.36,146.8) 2733.98,146.8 2733.98,183.92 cw(c2745.23,183.92) 2756.48,183.92 2756.48,146.8 ccw(c2783.11,146.8) 2809.73,146.8 2809.73,179.58 cw(c2820.98,179.58) 2832.23,179.58 2832.23,148.75 ccw(c2858.85,148.75) 2858.26,122.13 2969.52,122.13 ccw(c2969.52,162.76) 3010.05,159.85 ccw(c2987.23,161.44) 3010.09,160.73 3010.15,162.52 ccw(c3002.65,162.77) 3010.15,162.76 3010.15,200.1 3010,200.1 3010,618.71 cw(c3032.96,618.71) 3032.96,641.67 3070.61,641.67 3091.87,641.67 cw(c3091.87,632.92) 3100.62,632.92 3100.62,630.71 ccw(c3109.37,630.71) 3118.12,630.71 3118.12,632.92 cw(c3126.87,632.92) 3126.87,641.67 3153.75,641.67 3233.51,641.67 cw(c3233.51,634.17) 3236.1,641.21 3240.19,639.7 D8.9@3248.25,639.51 D8.2@3279.75,639.51 3287.81,639.7 3291.9,641.21 cw(c3294.49,634.17) 3294.49,641.67 3364.27,641.67 J2.9@3364.36,641.58
HDMI_TX1_N: D9.5 D9.6 J2.8 U13B.78 | length 2890.8
  Top Layer w7.5: v1(2203.66,-47.49) ccw(c2209.05,-47.49) 2205.23,-51.3 2206.25,-52.32 cw(c2199.99,-58.58) 2208.85,-58.58 U13B.78@2208.85,-78.56
  Bottom Layer w7.5: v1(2203.66,-47.49) ccw(c2209.05,-47.49) 2205.24,-51.3 cw(c2196.52,-60.02) 2208.85,-60.02 2208.85,-80.06 ccw(c2237.78,-80.06) 2237.78,-109 2237.9,-109 3151.49,-108.78 ccw(c3151.56,-68.95) 3191.38,-68.95 3191.38,-67.5 3191.38,-23.18 cw(c3200.13,-23.18) 3200.13,-14.43 3220.12,-14.43 ccw(c3220.12,9.69) 3220.12,33.81 3168.66,33.81 cw(c3168.66,42.56) 3168.66,51.31 3220.12,51.31 ccw(c3220.12,75.44) 3220.12,99.56 3168.66,99.56 cw(c3168.66,108.31) 3168.66,117.06 3220.12,117.06 ccw(c3220.12,141.19) 3220.12,165.31 3168.66,165.31 cw(c3168.66,174.06) 3168.66,182.81 3220.12,182.81 ccw(c3220.12,206.93) 3220.12,231.06 3168.66,231.06 cw(c3168.66,239.81) 3168.66,248.56 3220.12,248.56 ccw(c3220.12,272.68) 3220.12,296.81 3171.72,296.81 cw(c3171.72,305.56) 3171.72,314.31 3208.75,314.31 ccw(c3208.75,338.43) 3208.75,362.55 3200.13,362.55 cw(c3200.13,371.3) 3191.38,371.3 3191.38,435.13 3191.38,442.93 cw(c3209.12,442.93) 3209.12,460.66 3233.51,460.66 cw(c3233.51,453.16) 3236.1,460.2 3240.19,458.7 D9.6@3248.25,458.51 D9.5@3286.57,458.5 ; D9.5@3279.75,458.51 3287.81,458.7 3291.9,460.2 cw(c3294.49,453.16) 3294.49,460.66 3463.5,460.67 ccw(c3463.5,483.54) 3486.37,483.54 3486.37,610.17 ccw(c3463.5,610.17) 3483.76,620.78 3483.52,621.25 ccw(c3463.27,610.62) 3482.92,622.32 3482.07,623.76 ccw(c3475.62,619.92) 3481.63,624.41 ccw(c3463.36,610.65) 3463.41,633.52 3442.83,633.52 ccw(c3442.83,610.65) 3442.47,633.52 3432.74,633.35 cw(c3432.61,640.85) 3431.57,633.43 3428.33,633.52 J2.8@3412.39,633.71
HDMI_TX1_P: D9.4 D9.7 J2.6 U13B.76 | length 2890.8
  Top Layer w7.5: U13B.76@2224.22,-78.56 2224.22,-58.58 cw(c2233.07,-58.58) 2226.81,-52.32 2227.83,-51.3 ccw(c2224.02,-47.49) v1(2229.41,-47.49)
  Bottom Layer w7.5: v1(2229.41,-47.49) cw(c2224.02,-47.49) 2227.83,-51.3 ccw(c2236.54,-60.02) 2224.22,-60.02 2224.22,-79.99 ccw(c2237.86,-79.99) 2237.86,-93.62 2256.29,-93.62 2260.04,-93.62 2278.6,-93.61 ccw(c2278.6,-82.36) 2289.85,-82.36 2289.85,-76.28 cw(c2301.1,-76.28) 2312.35,-76.28 2312.35,-82.35 ccw(c2323.6,-82.35) 2334.85,-82.35 2334.85,-79.21 cw(c2346.1,-79.21) 2357.35,-79.21 2357.35,-82.34 ccw(c2368.6,-82.34) 2368.6,-93.59 2391.1,-93.59 2394.85,-93.59 3151.49,-93.4 ccw(c3151.56,-68.95) 3176.01,-68.95 3176.01,-67.5 3176.01,-23.18 cw(c3200.13,-23.18) 3200.13,0.94 3220.12,0.94 ccw(c3220.12,9.69) 3220.12,18.44 3168.66,18.44 cw(c3168.66,42.56) 3168.66,66.69 3220.12,66.69 ccw(c3220.12,75.44) 3220.12,84.19 3168.66,84.19 cw(c3168.66,108.31) 3168.66,132.44 3220.12,132.44 ccw(c3220.12,141.19) 3220.12,149.94 3168.66,149.94 cw(c3168.66,174.06) 3168.66,198.18 3220.12,198.18 ccw(c3220.12,206.93) 3220.12,215.68 3168.66,215.68 cw(c3168.66,239.81) 3168.66,263.93 3220.12,263.93 ccw(c3220.12,272.68) 3220.12,281.43 3171.72,281.43 cw(c3171.72,305.56) 3171.72,329.68 3208.75,329.68 ccw(c3208.75,338.43) 3208.75,347.18 3200.13,347.18 cw(c3200.13,371.3) 3176.01,371.3 3176.01,435.13 3176.01,449.3 cw(c3202.75,449.3) 3202.75,476.04 3233.46,476.04 cw(c3233.51,460.66) 3233.51,476.04 ccw(c3233.51,483.54) 3236.1,476.5 3240.19,478.01 D9.7@3248.25,478.19 D9.4@3280.2,478.18 ; D9.4@3279.75,478.19 D9.4@3280.2,478.18 ; D9.4@3286.57,478.18 D9.4@3280.2,478.18 ; J2.6@3412.39,617.96 3428.33,617.98 3432.57,617.98 ccw(c3432.61,640.85) 3432.71,617.98 3463.23,618.12 cw(c3463.27,610.62) 3469.88,614.15 ; 3469.9,614.12 3470.14,613.65 cw(c3463.5,610.17) 3471,610.17 3471,483.54 cw(c3463.5,483.54) 3463.5,476.04 3294.49,476.04 cw(c3294.49,483.54) 3291.9,476.5 3287.81,478.01 D9.4@3280.2,478.18
HDMI_TX2_N: D8.4 D8.7 J2.5 U13B.72 | length 2891.2
  Top Layer w7.5: v1(2250.9,-20) ccw(c2256.29,-20) 2252.48,-23.81 2253.5,-24.83 cw(c2247.23,-31.09) 2256.09,-31.09 U13B.72@2256.09,-78.56
  Bottom Layer w7.5: v1(2250.9,-20) cw(c2256.29,-20) 2252.48,-16.19 ccw(c2243.77,-7.48) 2256.09,-7.48 2256.09,34.39 2256.26,37.2 2256.28,37.41 ccw(c2248.79,37.88) 2256.29,37.88 2256.29,68.97 cw(c2279.92,68.97) 2279.92,92.6 2324.2,92.6 cw(c2324.2,69.15) 2347.65,69.15 2347.65,28.19 ccw(c2356.4,28.19) 2365.15,28.19 2365.15,68.47 cw(c2389.27,68.47) 2413.4,68.47 2413.4,28.19 ccw(c2422.15,28.19) 2430.9,28.19 2430.9,68.47 cw(c2455.02,68.47) 2479.15,68.47 2479.15,28.19 ccw(c2487.9,28.19) 2496.65,28.19 2496.65,68.47 cw(c2520.77,68.47) 2544.9,68.47 2544.9,28.19 ccw(c2553.65,28.19) 2562.4,28.19 2562.4,68.47 cw(c2586.52,68.47) 2610.64,68.47 2610.64,28.19 ccw(c2619.39,28.19) 2628.14,28.19 2628.14,68.47 cw(c2652.27,68.47) 2676.39,68.47 2676.39,28.19 ccw(c2685.14,28.19) 2693.89,28.19 2693.89,68.47 cw(c2718.02,68.47) 2742.14,68.47 2742.14,28.19 ccw(c2750.89,28.19) 2759.64,28.19 2759.64,43.02 2759.64,65.25 cw(c2783.76,65.25) 2807.89,65.25 2807.89,43.02 2807.89,28.19 ccw(c2816.64,28.19) 2825.39,28.19 2825.39,36.58 2825.39,58.81 cw(c2849.51,58.81) 2873.64,58.81 2873.64,36.58 2873.64,28.19 ccw(c2882.39,28.19) 2891.14,28.19 2891.14,59.12 cw(c2915.26,59.12) 2939.39,59.12 2939.39,33.13 ccw(c2948.14,33.13) 2948.14,24.38 3012.27,24.38 3016.58,24.38 ccw(c3016.58,42.43) 3034.63,42.43 3034.63,562 cw(c3070.61,562) 3070.61,597.99 3233.51,597.99 ccw(c3233.51,605.49) 3236.1,598.45 D8.7@3240.19,599.96 ; D8.7@3248.25,600.14 D8.4@3279.75,600.14 3287.81,599.96 3291.9,598.45 ccw(c3294.49,605.49) 3294.49,597.99 3303.25,597.99 ccw(c3303.25,619.98) 3318.8,604.43 cw(c3331.99,591.27) 3331.99,609.9 3351.2,609.9 3364.18,609.9 J2.5@3364.36,610.09
HDMI_TX2_P: D8.5 D8.6 J2.3 U13B.70 | length 2891.2
  Top Layer w7.5: U13B.70@2271.46,-78.56 2271.46,-31.09 cw(c2280.32,-31.09) 2274.06,-24.83 2275.07,-23.81 ccw(c2271.26,-20) v1(2276.65,-20)
  Bottom Layer w7.5: v1(2276.65,-20) ccw(c2271.26,-20) 2275.07,-16.19 cw(c2283.78,-7.48) 2271.46,-7.48 2271.66,-7.48 2271.66,67.68 cw(c2279.16,67.64) 2272.5,71.08 cw(c2282.25,66.01) 2282.25,77 2323.75,77 cw(c2323.75,68.47) 2332.28,68.47 2332.28,28.19 ccw(c2356.4,28.19) 2380.52,28.19 2380.52,68.47 cw(c2389.27,68.47) 2398.02,68.47 2398.02,28.19 ccw(c2422.15,28.19) 2446.27,28.19 2446.27,68.47 cw(c2455.02,68.47) 2463.77,68.47 2463.77,28.19 ccw(c2487.9,28.19) 2512.02,28.19 2512.02,68.47 cw(c2520.77,68.47) 2529.52,68.47 2529.52,28.19 ccw(c2553.65,28.19) 2577.77,28.19 2577.77,68.47 cw(c2586.52,68.47) 2595.27,68.47 2595.27,28.19 ccw(c2619.39,28.19) 2643.52,28.19 2643.52,68.47 cw(c2652.27,68.47) 2661.02,68.47 2661.02,28.19 ccw(c2685.14,28.19) 2709.27,28.19 2709.27,68.47 cw(c2718.02,68.47) 2726.77,68.47 2726.77,28.19 ccw(c2750.89,28.19) 2775.01,28.19 2775.01,65.25 cw(c2783.76,65.25) 2792.51,65.25 2792.51,28.19 ccw(c2816.64,28.19) 2840.76,28.19 2840.76,58.81 cw(c2849.51,58.81) 2858.26,58.81 2858.26,28.19 ccw(c2882.39,28.19) 2906.51,28.19 2906.51,59.12 cw(c2915.26,59.12) 2924.01,59.12 2924.01,33.13 ccw(c2948.14,33.13) 2948.14,9.01 3016.58,9.01 ccw(c3016.58,42.43) 3050,42.43 3050,562 cw(c3070.61,562) 3070.61,582.61 3114.85,582.62 3136.1,582.62 cw(c3136.1,573.87) 3144.85,573.87 3144.85,571.14 ccw(c3153.6,571.14) 3162.35,571.14 3162.35,573.87 cw(c3171.1,573.87) 3171.1,582.62 3191.38,582.62 3233.51,582.62 cw(c3233.51,575.12) 3236.1,582.15 D8.6@3240.19,580.65 ; D8.6@3248.25,580.46 D8.5@3279.75,580.46 3287.81,580.65 3291.9,582.15 cw(c3294.49,575.12) 3294.49,582.62 3309.62,582.62 ccw(c3309.62,604.61) 3325.17,589.06 ; 3325.2,589.09 cw(c3338.35,575.9) 3338.35,594.53 J2.3@3351.2,594.53 ; J2.3@3351.2,594.53 3364.17,594.53 J2.3@3364.36,594.34
HDMI_TX_CEC: D9.2 D9.9 J2.15 U13B.51 | length 2002.8
  Top Layer w7.48: v1(2413.38,-47.49) U13B.51@2413.38,42.51
  Top Layer w7.5: v1(3210.04,700.64) 3300.98,700.64 cw(c3300.98,680.72) 3320.9,680.72 v1(3320.9,504.88)
  Bottom Layer w7.48: v1(2413.38,-47.49) 3060.4,-47.49 ccw(c3060.4,-14.01) 3093.88,-14.01 3093.88,505.29 cw(c3106.16,505.29) 3106.16,517.56 D9.9@3248.25,517.56 D9.2@3279.75,517.56 3299.24,517.56 cw(c3299.24,495.9) 3314.56,511.22 v1(3320.9,504.88)
  Bottom Layer w7.5: v1(3210.04,700.64) ccw(c3238.55,729.14) 3219.06,693.85 ccw(c3238.55,729.14) 3238.55,688.83 J2.15@3364.36,688.83
HDMI_TX_HPD: D9.1 D9.10 J2.1 U13B.53 | length 1676.7
  Top Layer w7: v1(2366.45,-25.3) 2366.92,-24.83 2387.83,-24.83 ccw(c2387.83,-15.02) 2397.63,-15.02 2397.63,0 U13B.53@2397.63,42.51
  Bottom Layer w7.48: v1(2366.45,-25.3) 2366.98,-25.82 3062.33,-25.82 ccw(c3062.33,-9.96) 3078.2,-9.96 3078.2,514.68 cw(c3100.77,514.68) 3100.77,537.25 D9.10@3248.25,537.25 D9.1@3279.75,537.25 3355.31,537.25 ccw(c3355.31,546.3) 3364.36,546.3 J2.1@3364.36,578.59
HDMI_TX_SCL: D10.5 D10.6 J2.17 U13B.100 | length 2944.6
  Top Layer w7: U13B.100@2035.43,-78.75 1901.64,-78.75 cw(c1901.64,-60.68) 1883.58,-60.68 1883.58,488.28 cw(c1919,488.28) 1919,523.7 2724.45,523.7 cw(c2724.45,503.15) 2745,503.15 v1(2745,253.38)
  Bottom Layer w7.48: 2986.07,724.57 D10.6@3248.25,724.57
  Bottom Layer w7.5: v1(2745,253.38) 2946.83,253.38 ccw(c2946.83,280.07) 2973.52,280.07 2973.52,712.02 cw(c2986.07,712.02) 2986.07,724.57 ; D10.6@3248.25,724.57 D10.5@3279.75,724.57 3279.9,724.57 3279.9,712.45 ccw(c3287.78,712.45) 3287.78,704.57 J2.17@3364.36,704.57
HDMI_TX_SDA: D10.4 D10.7 J2.18 U13B.99 | length 2925.7
  Top Layer w7: U13B.99@2035.43,42.51 1920,42.51 cw(c1920,64.8) 1897.71,64.8 1897.71,487.71 cw(c1920,487.71) 1920,510 2709.59,510 cw(c2709.59,494.49) 2725.09,494.49 v1(2725.09,273.31) ; v1(3314.09,744.11) 3314.09,728.08 ccw(c3327.1,728.08) 3327.1,715.07 v1(3471.44,715.07)
  Bottom Layer w7: v1(2725.09,273.31) 2940.47,273.31 ccw(c2940.47,290.02) 2957.18,290.02 2957.18,718.22 cw(c2983.22,718.22) 2983.22,744.25 ; D10.7@3248.25,744.25 D10.4@3279.75,744.25 ; D10.4@3279.9,744.11 v1(3314.09,744.11) ; J2.18@3412.6,712.24 3466.24,712.24 3469.07,715.07 v1(3471.44,715.07)
  Bottom Layer w7.48: 2983.22,744.25 D10.7@3248.25,744.25
HDMI_TXCLK_N: D10.1 D10.10 J2.14 U13B.90 | length 2770.2
  Top Layer w7.5: v1(2109.17,-47.49) ccw(c2114.56,-47.49) 2110.74,-51.3 2111.76,-52.32 cw(c2105.5,-58.58) 2114.36,-58.58 U13B.90@2114.36,-78.56 ; v1(3314.09,806.34) ccw(c3314.09,800.95) 3310.28,804.76 cw(c3301.57,813.48) 3301.57,801.15 3292.32,801.15 cw(c3292.32,813.48) 3280,813.48 3280,833.53 cw(c3297.22,833.53) 3297.22,850.74 3533.72,850.74 cw(c3533.72,829.46) 3555,829.46 3555,690 cw(c3545.76,690) 3545.76,680.76 3525.3,680.76 cw(c3525.3,693.08) 3516.59,684.37 ccw(c3512.78,680.56) v1(3512.78,685.95)
  Bottom Layer w7.5: v1(2109.17,-47.49) cw(c2114.56,-47.49) 2110.75,-43.68 ccw(c2102.04,-34.97) 2114.36,-34.97 2114.36,293.41 cw(c2153.11,293.41) 2153.07,332.16 2895.23,332.16 ccw(c2895.23,357.5) 2920.56,357.5 2920.56,774.13 2920.56,774.21 cw(c2947.58,774.13) 2947.58,801.15 3123.75,801.15 3127.5,801.15 ccw(c3127.5,809.9) 3136.25,809.9 3136.25,827.28 cw(c3145,827.28) 3153.75,827.28 3153.75,809.9 ccw(c3162.5,809.9) 3171.25,809.9 cw(c3180,809.91) 3188.75,809.91 ccw(c3197.5,809.9) 3197.5,801.15 3233.51,801.15 ccw(c3233.51,808.65) 3236.1,801.62 3240.19,803.12 D10.10@3248.25,803.31 D10.1@3279.75,803.31 3286.1,803.31 cw(c3286.1,799.63) 3288.7,802.23 ccw(c3291.3,804.83) 3291.3,801.15 3301.57,801.15 ccw(c3301.57,813.48) 3310.28,804.76 cw(c3314.09,800.95) v1(3314.09,806.34) ; J2.14@3412.39,680.95 3412.58,680.76 3428.7,680.76 3501.7,680.76 ccw(c3501.7,689.62) 3507.96,683.36 3508.97,684.37 cw(c3512.78,680.56) v1(3512.78,685.95)
HDMI_TXCLK_P: D10.2 D10.9 J2.12 U13B.88 | length 2770.3
  Top Layer w7.5: U13B.88@2129.73,-78.56 2129.73,-58.58 cw(c2138.59,-58.58) 2132.32,-52.32 2133.34,-51.3 ccw(c2129.53,-47.49) v1(2134.92,-47.49) ; v1(3314.09,780.59) cw(c3314.09,785.98) 3310.28,782.17 ccw(c3301.57,773.46) 3301.57,785.78 3285.95,785.78 cw(c3285.95,807.11) 3264.63,807.11 3264.63,833.53 cw(c3297.22,833.53) 3297.22,866.12 3533.72,866.12 cw(c3533.72,829.46) 3570.37,829.46 3570.37,690 cw(c3545.76,690) 3545.76,665.39 3525.3,665.39 ccw(c3525.3,653.07) 3516.59,661.78 cw(c3512.78,665.59) v1(3512.78,660.2)
  Bottom Layer w7.5: v1(2134.92,-47.49) ccw(c2129.53,-47.49) 2133.34,-43.68 cw(c2142.05,-34.97) 2129.73,-34.97 2129.73,293.41 cw(c2153.11,293.41) 2153.07,316.79 2895.23,316.79 ccw(c2895.23,357.5) 2935.94,357.43 ccw(c2920.56,357.5) 2935.94,357.5 2935.94,773.27 cw(c2948.45,773.27) 2948.45,785.78 3200,785.78 3233.51,785.78 cw(c3233.51,778.28) 3236.1,785.32 3240.19,783.81 D10.9@3248.25,783.62 D10.2@3279.75,783.62 3286.1,783.62 ccw(c3286.1,787.3) 3288.7,784.7 cw(c3291.3,782.1) 3291.3,785.78 3301.57,785.78 cw(c3301.57,773.46) 3310.28,782.17 ccw(c3314.09,785.98) v1(3314.09,780.59) ; J2.12@3412.39,665.2 3412.58,665.39 3428.7,665.39 3501.7,665.39 cw(c3501.7,656.53) 3507.96,662.79 v1@3508.97,661.78 ; v1@3508.98,661.77 ccw(c3512.78,665.59) v1(3512.78,660.2)
I2C0_SCL_PMIC: P16.1 U13A.80 | length 137.5
  Top Layer w7: U13A.80@2192.91,1256.69 v1(2192.91,1284.59)
  Bottom Layer w10: P16.1@2192.91,1175 v1(2192.91,1284.59)
I2C0_SDA_PMIC: P17.1 U13A.82 | length 222.1
  Top Layer w7: U13A.82@2177.16,1256.69 2177.16,1096.88 ccw(c2204.05,1096.88) 2185.04,1077.87 v1(2192.91,1070)
  Bottom Layer w10: v1(2192.91,1070) P17.1@2192.91,1100
LCD0_PWM: R16.1 U13A.31 | length 3272
  Top Layer w7: v1(1235,299) 1540,299 ccw(c1540,313.59) 1554.59,313.59 1554.59,587.23 cw(c1572.22,587.23) 1572.22,604.86 2949.22,604.86 ccw(c2949.22,630.64) 2975,630.64 2975,1068.31 ccw(c2956.31,1068.31) 2956.31,1087 2901,1087 cw(c2901,1111) 2877,1111 2877,1299.85 ccw(c2858.8,1299.85) 2858.8,1318.05 2590.75,1318.05 cw(c2590.75,1337.93) 2570.86,1337.93 U13A.31@2570.86,1377.95
  Bottom Layer w7: R16.1@1234.46,407.23 R16.1@1235,406.68
  Bottom Layer w10: v1(1235,299) R16.1@1235,406.68
LCD0_RESET: J3.5 R19.1 R20.2 | length 124.7
  Bottom Layer w10: J3.5@1525.59,521.65 1525.59,451.49 ccw(c1531.5,451.49) R19.1@1531.5,445.59
  Bottom Layer w15: R19.1@1531.5,445.59 R20.2@1576.74,445.59
LCD0_RST: R20.1 U13A.29 | length 2767.8
  Top Layer w7: v1(1576.74,388.66) 1576.74,573.35 cw(c1592.76,573.35) 1592.76,589.37 2953.74,589.37 ccw(c2953.74,626.64) 2991,626.64 2991,1070.04 ccw(c2958.14,1070.04) 2958.14,1102.9 2908,1102.9 cw(c2908,1118.9) 2892,1118.9 2892,1308.85 ccw(c2868.27,1308.85) 2868.27,1332.58 2600.64,1332.58 cw(c2600.64,1346.61) 2586.61,1346.61 U13A.29@2586.61,1377.95
  Bottom Layer w15: v1(1576.74,388.66) R20.1@1576.74,408.59
LED_DIY: LED4.2 R30.1 | length 61.2
  Top Layer w15: v1(802.68,634) LED4.2@828.65,634
  Bottom Layer w7: R30.1@839.68,634 R30.1@839.95,634
  Bottom Layer w20: v1(802.68,634) R30.1@837.68,634
LED_WORK: LED3.2 R31.1 | length 61.3
  Top Layer w15: v1(802,512.86) LED3.2@828.25,512.86
  Bottom Layer w20: v1(802,512.86) R31.1@837.1,512.86
LEDA: C22.2 D12.1 J3.27 | length 1644.3
  Top Layer w12: D12.1@990,407.61 D12.1@991.5,409.11
  Top Layer w30: v1(990,319.43) v1(990,344.69) D12.1@990,407.61
  Bottom Layer w12: 1939.54,570.6 cw(c1939.54,551.48) 1958.66,551.48 ; J3.27@1958.66,521.65 1958.66,551.48 ; 1977.78,570.6 ccw(c1977.78,551.48) 1958.66,551.48
  Bottom Layer w25: v1(990,319.43) v1(990,344.69) 990,539.02 cw(c1027.56,539.02) 1027.56,576.58 2095.88,576.58 cw(c2095.88,549.02) 2123.44,549.02 C22.2@2123.44,475.09
LEDK: J3.29 R17.2 | length 141.9
  Bottom Layer w12: J3.29@1998.03,521.65 1998.03,459.37 ccw(c2011.81,459.37) 2011.81,445.59 R17.2@2069.82,445.59
MIPI_DSI_TX1_CLK_N: J3.18 U13B.87 | length 964.4
  Top Layer w7.5: v1(2058.35,295.19) cw(c2058.35,289.8) 2062.16,293.61 ccw(c2070.87,302.32) 2070.87,290 2100,290 cw(c2100,260.08) 2129.92,260.08 U13B.87@2129.92,42.51
  Bottom Layer w7.5: J3.18@1781.5,521.65 1779.34,499.81 1779.34,493.81 cw(c1763.97,493.81) 1779.34,493.76 1779.34,292.87 ccw(c1786.84,292.87) 1786.84,285.37 1810.22,285.37 ccw(c1810.22,292.87) 1817.71,292.62 1817.92,299.47 cw(c1842.03,298.75) 1866.16,298.75 1866.16,292.09 ccw(c1874.91,292.09) 1883.66,292.09 1883.66,298.75 cw(c1907.78,298.75) 1931.9,298.75 1931.9,292.59 ccw(c1940.65,292.59) 1949.4,292.59 1949.4,298.75 cw(c1973.53,298.75) 1997.65,298.75 ccw(c2006.4,298.75) 2006.4,290 2045.82,290 ccw(c2045.82,302.32) 2054.54,293.61 cw(c2058.35,289.8) v1(2058.35,295.19)
MIPI_DSI_TX1_CLK_P: J3.17 U13B.89 | length 964.4
  Top Layer w7.5: v1(2058.35,269.44) ccw(c2058.35,274.83) 2062.16,271.02 cw(c2070.87,262.3) 2070.87,274.63 2100,274.63 cw(c2100,260.46) 2114.17,260.46 U13B.89@2114.17,42.51
  Bottom Layer w7.5: J3.17@1761.81,521.65 1763.97,499.81 1763.97,493.83 ; 1763.97,493.81 1763.97,292.86 ccw(c1786.84,292.87) 1786.84,270 1810.53,270 ccw(c1810.53,292.75) 1833.28,292.75 1833.28,298.75 cw(c1842.03,298.75) 1850.78,298.75 1850.78,292.09 ccw(c1874.91,292.09) 1899.03,292.09 1899.03,298.75 cw(c1907.78,298.75) 1916.53,298.75 1916.53,292.59 ccw(c1940.65,292.59) 1964.78,292.59 1964.78,298.75 cw(c1973.53,298.75) 1982.28,298.75 ccw(c2006.4,298.75) 2006.4,274.63 2045.82,274.63 cw(c2045.82,262.3) 2054.54,271.02 ccw(c2058.35,274.83) v1(2058.35,269.44)
MIPI_DSI_TX1_D0_N: J3.24 U13B.75 | length 965.7
  Top Layer w7.5: v1(1938.35,455.19) cw(c1938.35,449.8) 1942.16,453.61 ccw(c1950.87,462.32) 1950.87,450 2286.91,450 cw(c2286.91,410.34) 2326.57,410.34 2326.57,203.55 cw(c2286.76,203.55) 2286.76,163.73 2242.71,163.73 ccw(c2242.71,145.24) 2224.22,145.24 U13B.75@2224.22,42.51
  Bottom Layer w7.5: J3.24@1899.61,521.65 ccw(c1899.61,519.5) 1897.45,519.5 1897.45,465.94 ccw(c1913.38,465.94) 1913.38,450 1925.82,450 ccw(c1925.82,462.32) 1934.54,453.61 cw(c1938.35,449.8) v1(1938.35,455.19)
MIPI_DSI_TX1_D0_P: J3.23 U13B.77 | length 965.7
  Top Layer w7.5: v1(1938.35,429.44) ccw(c1938.35,434.83) 1942.16,431.02 cw(c1950.87,422.3) 1950.87,434.63 2286.91,434.63 cw(c2286.91,410.34) 2311.2,410.34 2311.2,203.55 cw(c2286.76,203.55) 2286.76,179.11 2242.71,179.11 ccw(c2242.71,145.24) 2208.85,145.24 U13B.77@2208.85,42.51
  Bottom Layer w7.5: J3.23@1879.92,521.65 cw(c1879.92,519.5) 1882.08,519.5 1882.08,465.94 ccw(c1913.38,465.94) 1913.38,434.63 1925.82,434.63 cw(c1925.82,422.3) 1934.54,431.02 ccw(c1938.35,434.83) v1(1938.35,429.44)
MIPI_DSI_TX1_D1_N: J3.21 U13B.81 | length 965.4
  Top Layer w7.5: v1(1938.35,375.19) cw(c1938.35,369.8) 1942.16,373.61 ccw(c1950.87,382.32) 1950.87,370 2229.7,370 cw(c2229.7,324.73) 2274.97,324.73 2274.97,284.41 cw(c2235.19,284.41) 2235.19,244.63 2197.54,244.63 ccw(c2197.54,224.25) 2177.16,224.25 U13B.81@2177.16,42.51
  Bottom Layer w7.5: J3.21@1840.55,521.65 ccw(c1840.55,519.5) 1838.39,519.5 1838.39,385.94 ccw(c1854.33,385.94) 1854.33,370 1886.81,370 1925.82,370 ccw(c1925.82,382.32) 1934.54,373.61 cw(c1938.35,369.8) v1(1938.35,375.19)
MIPI_DSI_TX1_D1_P: J3.20 U13B.83 | length 965.7
  Top Layer w7.5: v1(1938.35,349.44) ccw(c1938.35,354.83) 1942.16,351.02 cw(c1950.87,342.3) 1950.87,354.63 2229.7,354.63 cw(c2229.7,324.73) 2259.6,324.73 2259.6,284.41 cw(c2235.19,284.41) 2235.19,260 2197.54,260 ccw(c2197.54,223.88) 2161.41,223.88 U13B.83@2161.41,42.51
  Bottom Layer w7.5: J3.20@1820.87,521.65 cw(c1820.87,519.5) 1823.02,519.5 1823.02,385.94 ccw(c1854.33,385.94) 1854.33,354.63 1925.82,354.63 cw(c1925.82,342.3) 1934.54,351.02 ccw(c1938.35,354.83) v1(1938.35,349.44)
MIPI_DSI_TX1_D2_N: J3.15 U13B.93 | length 965.8
  Top Layer w7.5: v1(2018.35,195.19) cw(c2018.35,189.8) 2022.16,193.61 ccw(c2030.87,202.32) 2030.87,190 2055.11,190 cw(c2055.11,162.63) 2082.49,162.63 2082.49,42.7 U13B.93@2082.67,42.51
  Bottom Layer w7.5: J3.15@1722.44,521.65 ccw(c1722.44,519.5) 1720.28,519.5 1720.28,208.06 ccw(c1738.35,208.06) 1738.35,190 1786.85,190 ccw(c1786.85,198.75) 1795.51,197.5 ccw(c1788.09,198.59) 1795.58,198.11 1795.59,198.27 ccw(c1788.1,198.75) 1795.6,198.75 1795.6,214.38 cw(c1819.72,214.38) 1843.85,214.38 1843.85,198.15 ccw(c1852.6,198.15) 1861.35,198.15 1861.35,214.94 cw(c1885.47,214.94) 1909.6,214.94 1909.6,198.75 ccw(c1918.35,198.75) 1918.35,190 2005.82,190 ccw(c2005.82,202.32) 2014.54,193.61 cw(c2018.35,189.8) v1(2018.35,195.19)
MIPI_DSI_TX1_D2_P: J3.14 U13B.95 | length 965.8
  Top Layer w7.5: v1(2018.35,169.44) ccw(c2018.35,174.83) 2022.16,171.02 cw(c2030.87,162.3) 2030.87,174.63 2055.11,174.63 cw(c2055.11,162.63) 2067.11,162.63 2067.11,42.7 U13B.95@2066.93,42.51
  Bottom Layer w7.5: J3.14@1702.75,521.65 cw(c1702.75,519.5) 1704.91,519.5 1704.91,208.06 ccw(c1738.35,208.06) 1738.35,174.63 1786.85,174.63 ccw(c1786.85,198.75) 1810.73,195.3 ; 1810.73,195.33 ccw(c1788.09,198.59) 1810.92,197.13 1810.93,197.29 ccw(c1788.1,198.75) 1810.97,198.75 1810.97,214.38 cw(c1819.72,214.38) 1828.47,214.38 1828.47,198.15 ccw(c1852.6,198.15) 1876.72,198.15 1876.72,214.94 cw(c1885.47,214.94) 1894.22,214.94 1894.22,198.75 ccw(c1918.35,198.75) 1918.35,174.63 2005.82,174.63 cw(c2005.82,162.3) 2014.54,171.02 ccw(c2018.35,174.83) v1(2018.35,169.44)
MIPI_DSI_TX1_D3_N: J3.12 U13B.94 | length 966.5
  Top Layer w7.5: v1(1987.45,5) cw(c1982.06,5) 1985.87,1.2 1984.07,-0.61 ccw(c1989.74,-6.27) 1981.73,-6.27 1981.73,-15 ccw(c1991.73,-15) 1991.73,-25 2055.11,-25 cw(c2055.11,-52.37) 2082.49,-52.37 2082.49,-78.56 U13B.94@2082.67,-78.75
  Bottom Layer w7.5: J3.12@1663.38,521.65 ccw(c1663.38,519.5) 1661.23,519.5 1661.23,200.39 ccw(c1729.03,200.39) 1729.03,132.59 1947.45,132.59 cw(c1947.45,98.31) 1981.73,98.31 1981.73,18.81 ccw(c1995.86,18.81) 1985.87,8.81 cw(c1982.06,5) v1(1987.45,5)
MIPI_DSI_TX1_D3_P: J3.11 U13B.96 | length 966.5
  Top Layer w7.5: v1(1960.64,5) ccw(c1966.02,5) 1962.21,1.2 1964.01,-0.61 cw(c1958.35,-6.27) 1966.35,-6.27 1966.35,-15 ccw(c1991.73,-15) 1991.73,-40.37 2055.11,-40.37 cw(c2055.11,-52.37) 2067.11,-52.37 2067.11,-78.56 U13B.96@2066.93,-78.75
  Bottom Layer w7.5: J3.11@1643.7,521.65 cw(c1643.7,519.5) 1645.86,519.5 1645.86,200.39 ccw(c1729.03,200.39) 1729.03,117.21 1947.45,117.21 cw(c1947.45,98.31) 1966.35,98.31 1966.35,18.81 cw(c1952.22,18.81) 1962.21,8.81 ccw(c1966.02,5) v1(1960.64,5)
NetC1_1: C1.1 C2.2 C3.2 C4.2 D2.2 F1.2 R3.2 U1.2
  other v1: 440,349.99 440,375.25 440,400.5 440,425.75 440,451
NetC1_2: C1.2 C2.1 C3.1 C4.1 D2.1 P2.1 R4.1 U1.1 | length 342.6
  Top Layer w10: U1.1@230,140 230,280 cw(c251.43,280) 251.43,301.43 v1(393.32,301.43)
  Bottom Layer w7: R4.1@393,274.5 R4.1@393.16,274.66 ; v1@393.16,301.27 v1(393.32,301.43)
  Bottom Layer w15: R4.1@393.16,274.66 v1@393.16,301.27
NetC5_2: C5.2 C6.2 D3.2 R2.1 U1.6
NetC23_2: C23.2 U5.2 | length 249
  Top Layer w7: U5.2@1398.97,454.23 1479.24,454.23 ccw(c1479.24,465.82) 1490.83,465.82 1490.83,517.5 ccw(c1478.33,517.5) 1478.33,530 C23.2@1399.08,530
NetC24_2: C24.2 C25.1 FB1.2 J3.3 | length 167.9
  Bottom Layer w10: FB1.2@1394,445.59 cw(c1394.81,445.59) FB1.2@1394.81,446.4 ; C25.1@1486.22,446.4 J3.3@1486.22,521.65
  Bottom Layer w15: FB1.2@1394.81,446.4 C24.2@1440.94,446.4 C25.1@1486.22,446.4
NetC26_1: C26.1 L3.2 | length 70.6
  Top Layer w13.1: C26.1@118,955.99 L3.2@188.63,955.99
NetC26_2: C26.2 J6.1 | length 65
  Top Layer w13.1: J6.1@-6.98,956 C26.2@58,955.99
NetD1_1: D1.1 F1.1 | length 167.5
  Top Layer w7: F1.1@368.03,637 v1(440,637)
  Bottom Layer w7: D1.1@345.74,634 348.74,637 v1(440,637)
  other v1: 440,586.5 440,611.75 440,662.25 440,687.5
NetD1_2: D1.2 P1.1
NetD12_2: D12.2 L2.2 U5.4
NetD13_1: D13.1 R21.2 | length 121.7
  Top Layer w7: D13.1@931.01,1129.62 931.01,1180
  Bottom Layer w7: R21.2@931.01,1108.69 931.01,1180
  other v1: 914.63,1180 943.01,1180
NetD15_1: D15.1 R26.1 SW1.1 | length 150.7
  Top Layer w7: SW1.1@522.94,640.64 535.58,653.28 SW1.1@535.58,656
  Top Layer w20: v1(500,640.64) SW1.1@522.94,640.64
  Bottom Layer w10: v1(500,640.64) 533.54,640.64 D15.1@535.57,640.64 533.54,642.67 533.54,706.19 R26.1@529.87,709.86
NetD17_1: D17.1 R29.1 SW2.1 | length 140.1
  Top Layer w7: SW2.1@520.58,492 ccw(c520.58,507) SW2.1@535.58,507
  Top Layer w20: v1(500,492) SW2.1@520.58,492
  Bottom Layer w7: R29.1@537.87,542 R29.1@541.26,538.61 ; D17.1@541.26,492 D17.1@543.58,492 D17.1@541.26,494.32
  Bottom Layer w10: v1(500,492) D17.1@541.26,492 ; D17.1@541.26,494.32 R29.1@541.26,538.61
NetD18_1: D18.1 R32.2 SW3.1 | length 140.8
  Top Layer w7: 519.33,339.75 ccw(c519.33,356) SW3.1@535.58,356
  Top Layer w20: v1(500,339.75) 519.33,339.75
  Bottom Layer w10: v1(500,339.75) D18.1@543.58,339.75 541.26,342.07 541.26,386.36 R32.2@537.87,389.75